# EAGLE board rpp_ok (EAGLE 6.6.0)

No outline drawn. Coordinates in mm, seen from the top.
Copper layers used: 

## Footprints (pad centres in the part's own frame; a part is rotated, then mirrored left to right if it is on the bottom)
HDR2 = smd 0.8 x 0.8: 1 0,0; 2 1.2,0
SOT23-3 = smd 0.8 x 0.8: D 2.4,0; G 0,0; S 1.2,0
R0603 = smd 0.8 x 0.8: 1 0,0; 2 1.2,0

## Placement (x,y rotation side)
J1  PWR  [HDR2]  0,0 0 top
Q1  AO3401A  [SOT23-3]  10,0 0 top
R1  100k  [R0603]  20,0 0 top
R2  1k  [R0603]  30,0 0 top

## Library data of the parts
J1 Q1 R1 R2 = device

## Nets
GND: J1.2 R1.2 R2.2
RPPG: Q1.G R1.1
VIN: J1.1 Q1.D
VOUT: Q1.S R2.1